# Altium PCB DRIVER POWER SUPPLY MODULE.PcbDoc
Units mm, origin at the board's own origin, x right, y up, seen from the top; angles counter-clockwise.
Board outline 240 x 215 mm, 2 copper layers (Top Layer, Bottom Layer), stack 1.371 mm thick; 120 components, 44 nets, 272 pads, 6 vias.
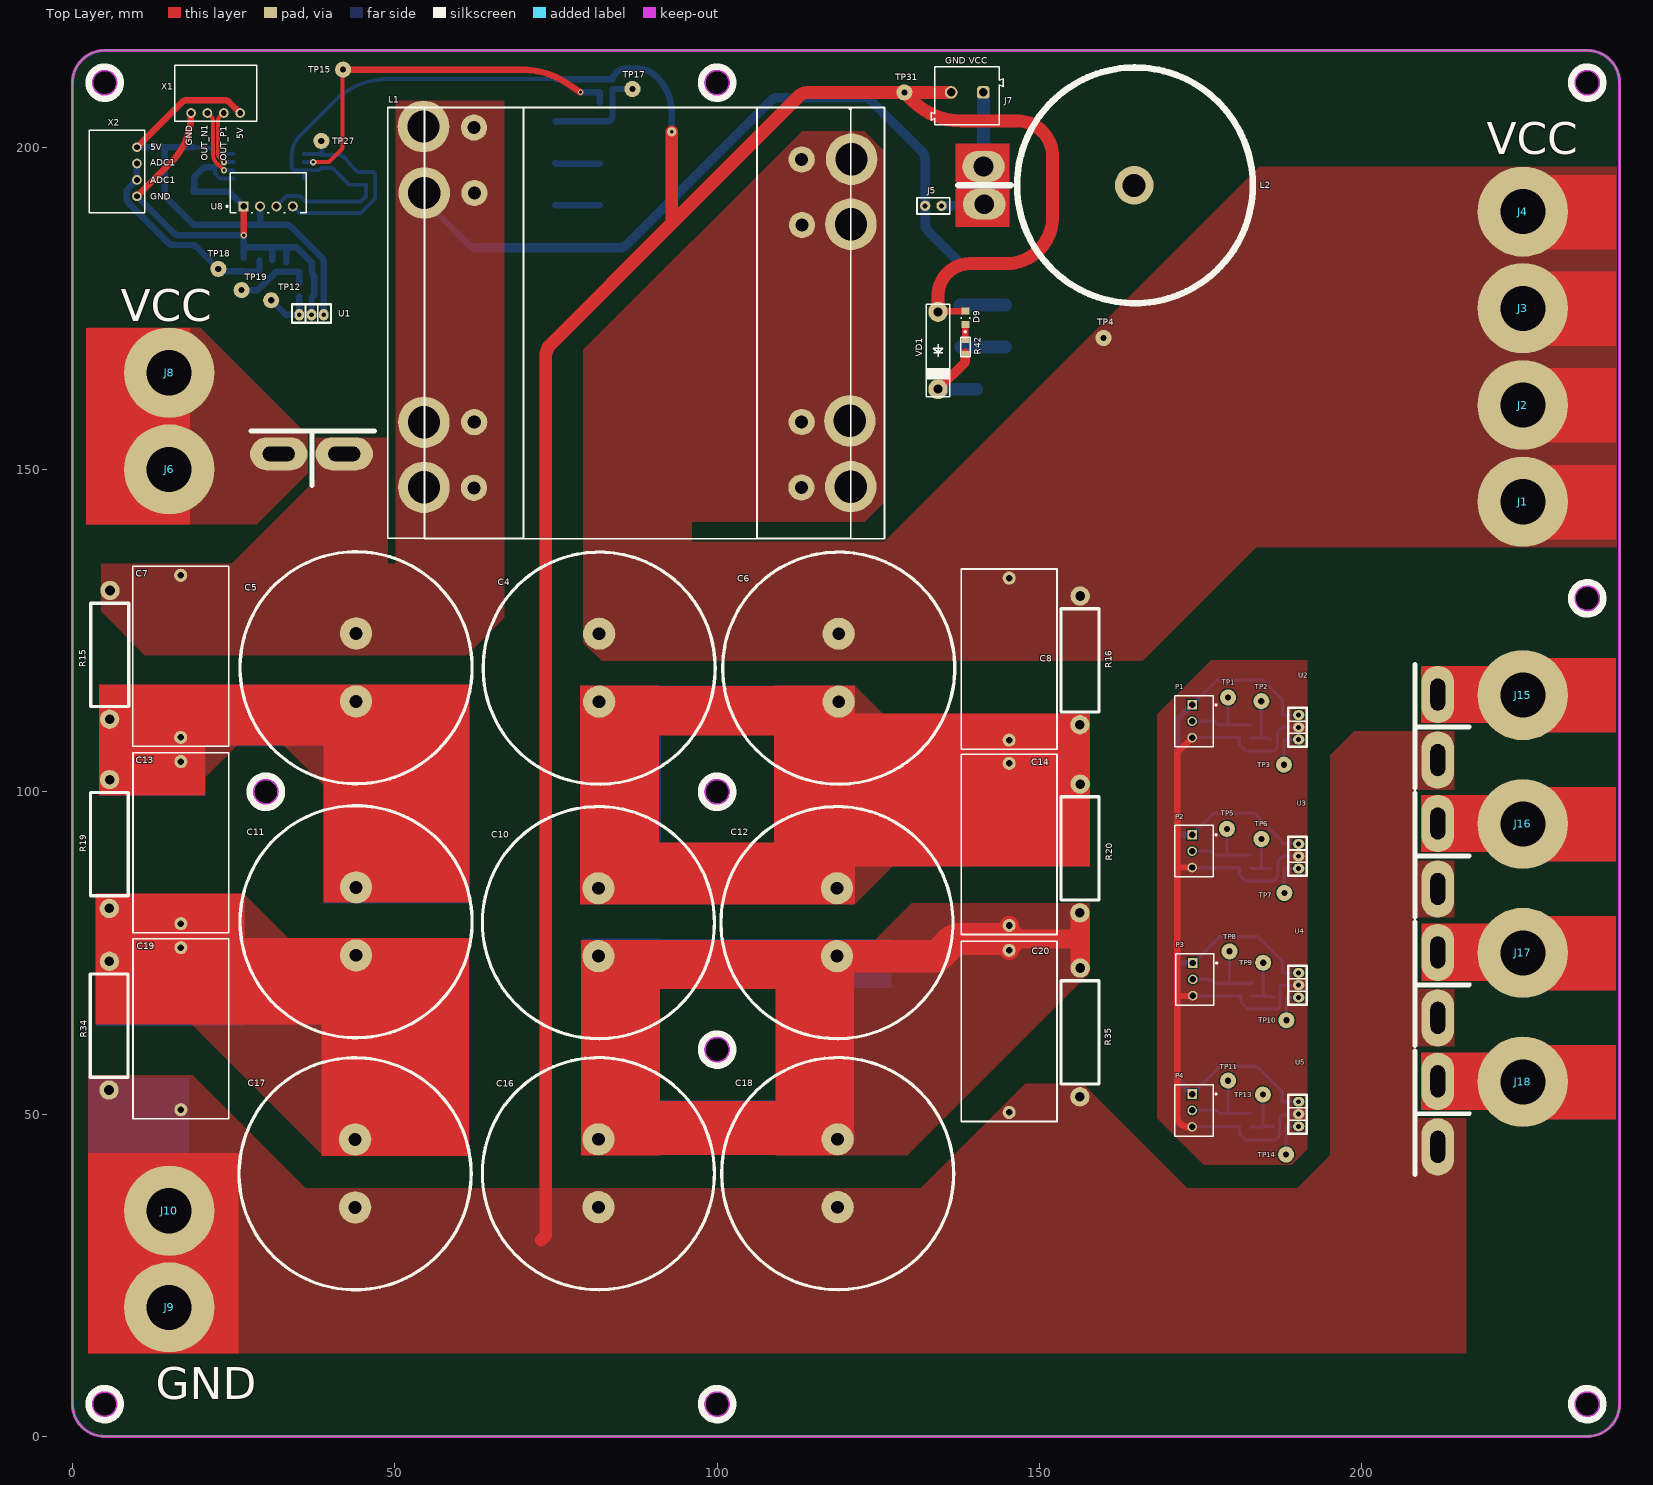
[diagram p0: Top Layer view]
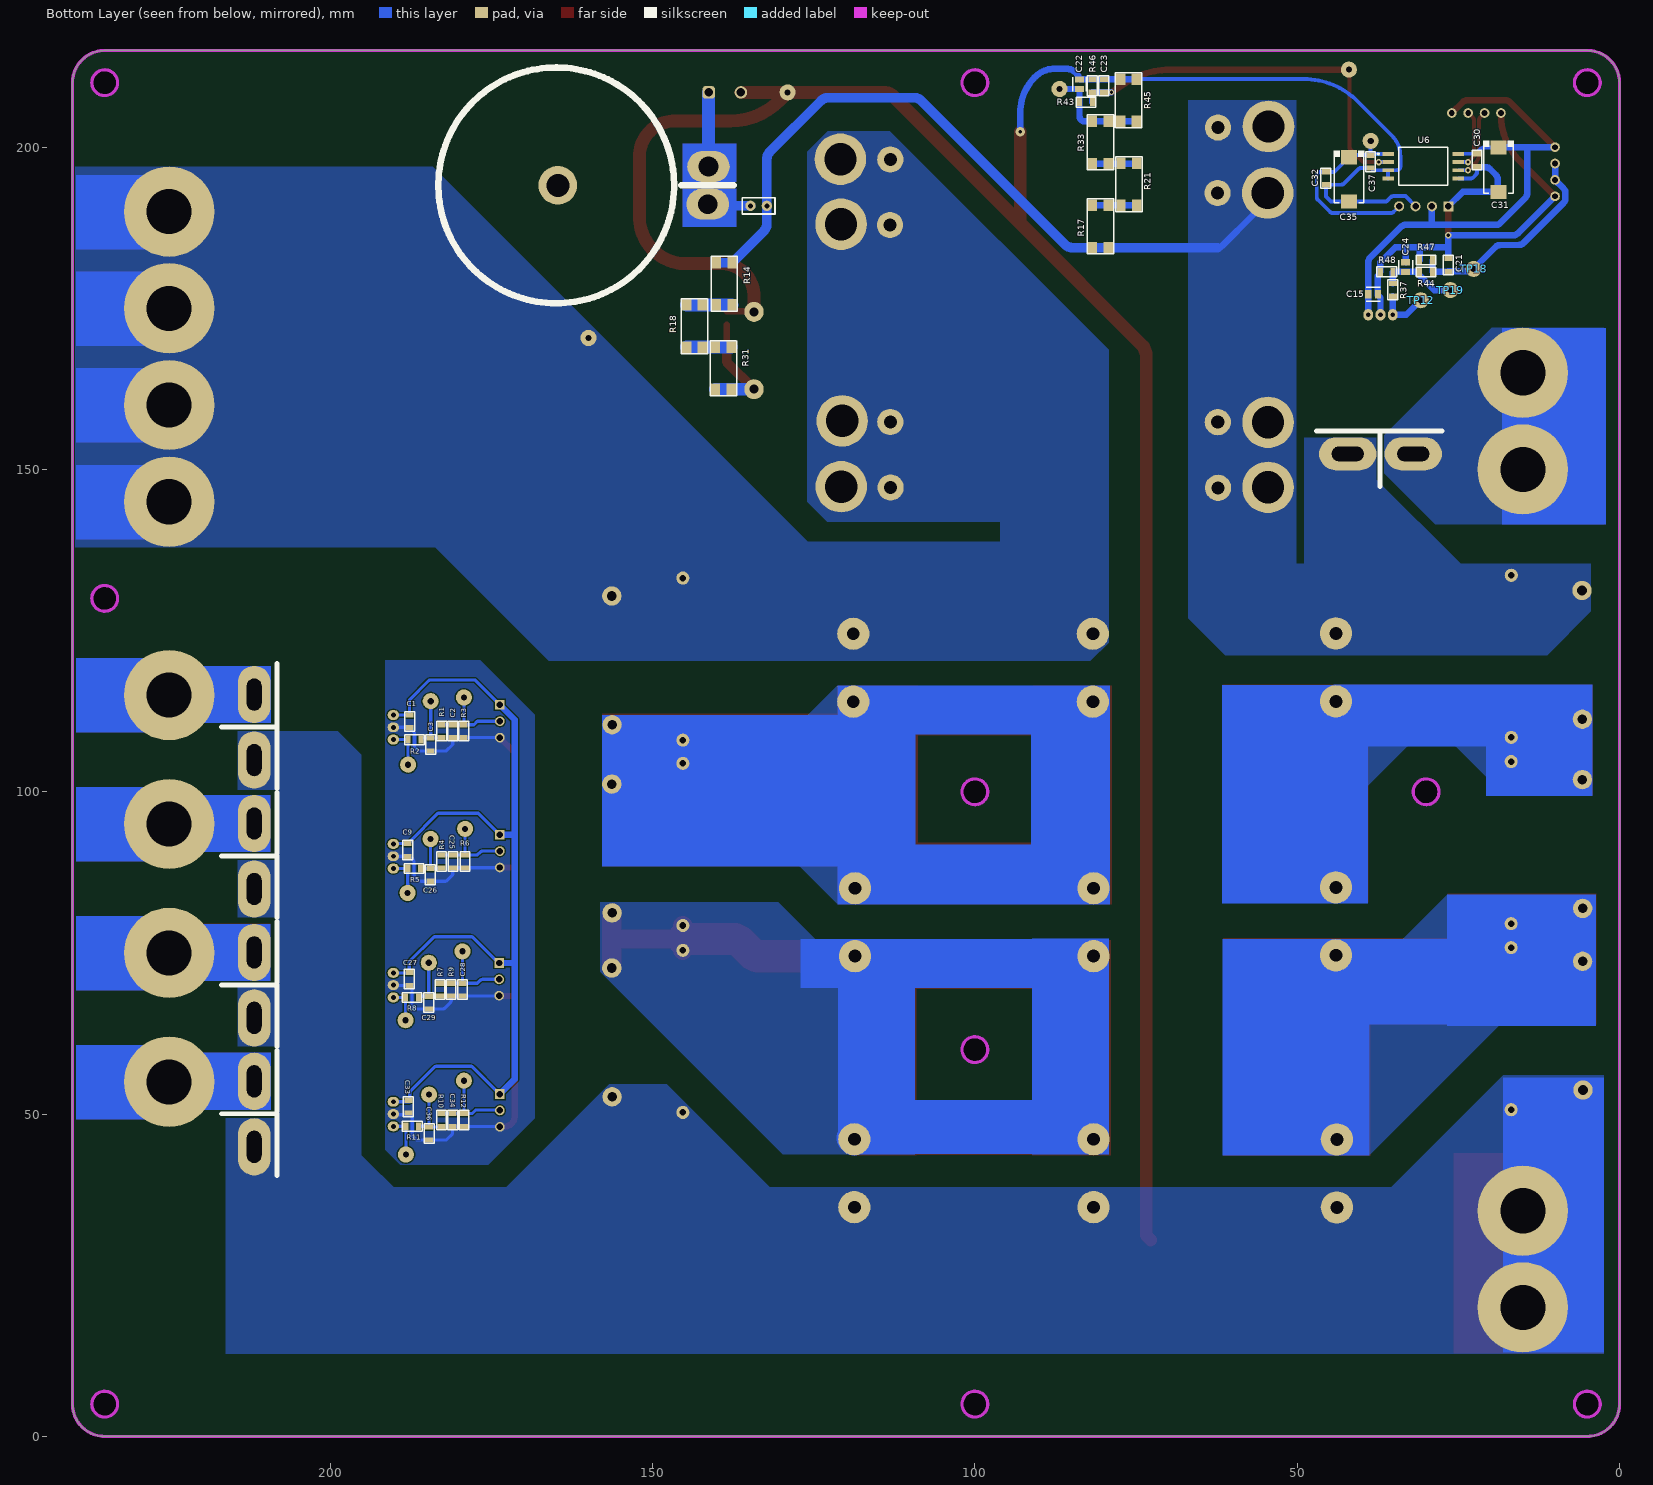
[diagram p1: Bottom Layer view, seen from below]
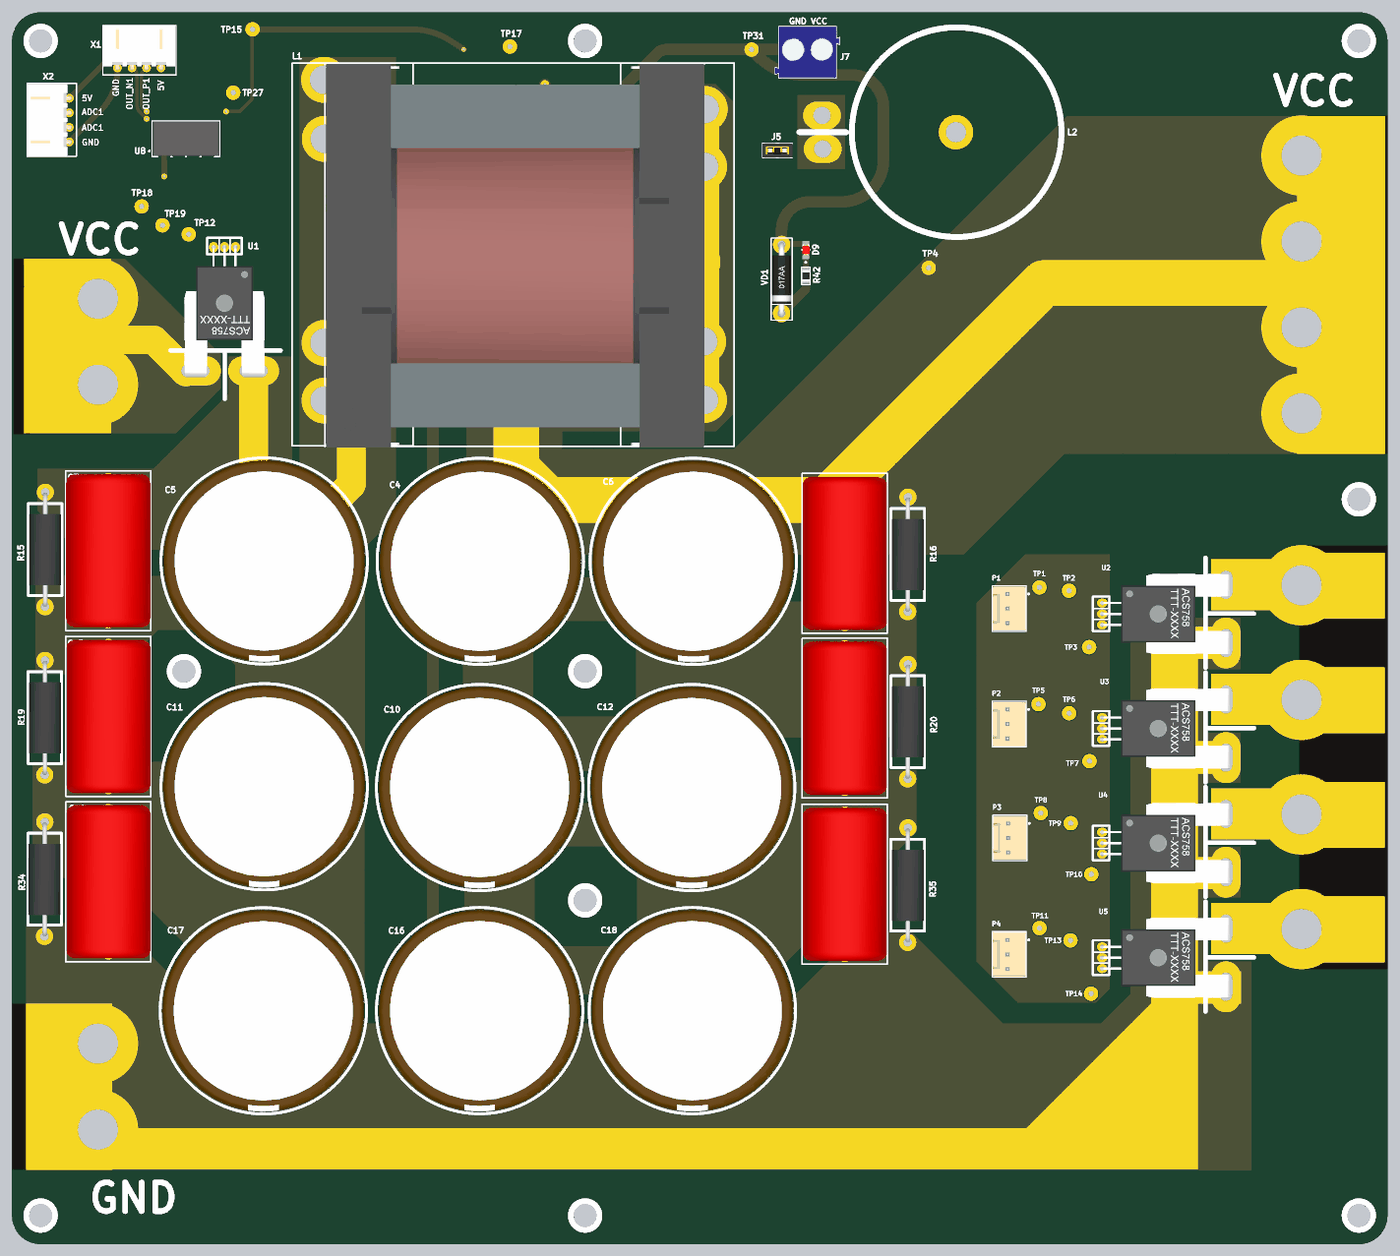
[diagram p2: 3D render of the assembled board from above, using the file's embedded part models]
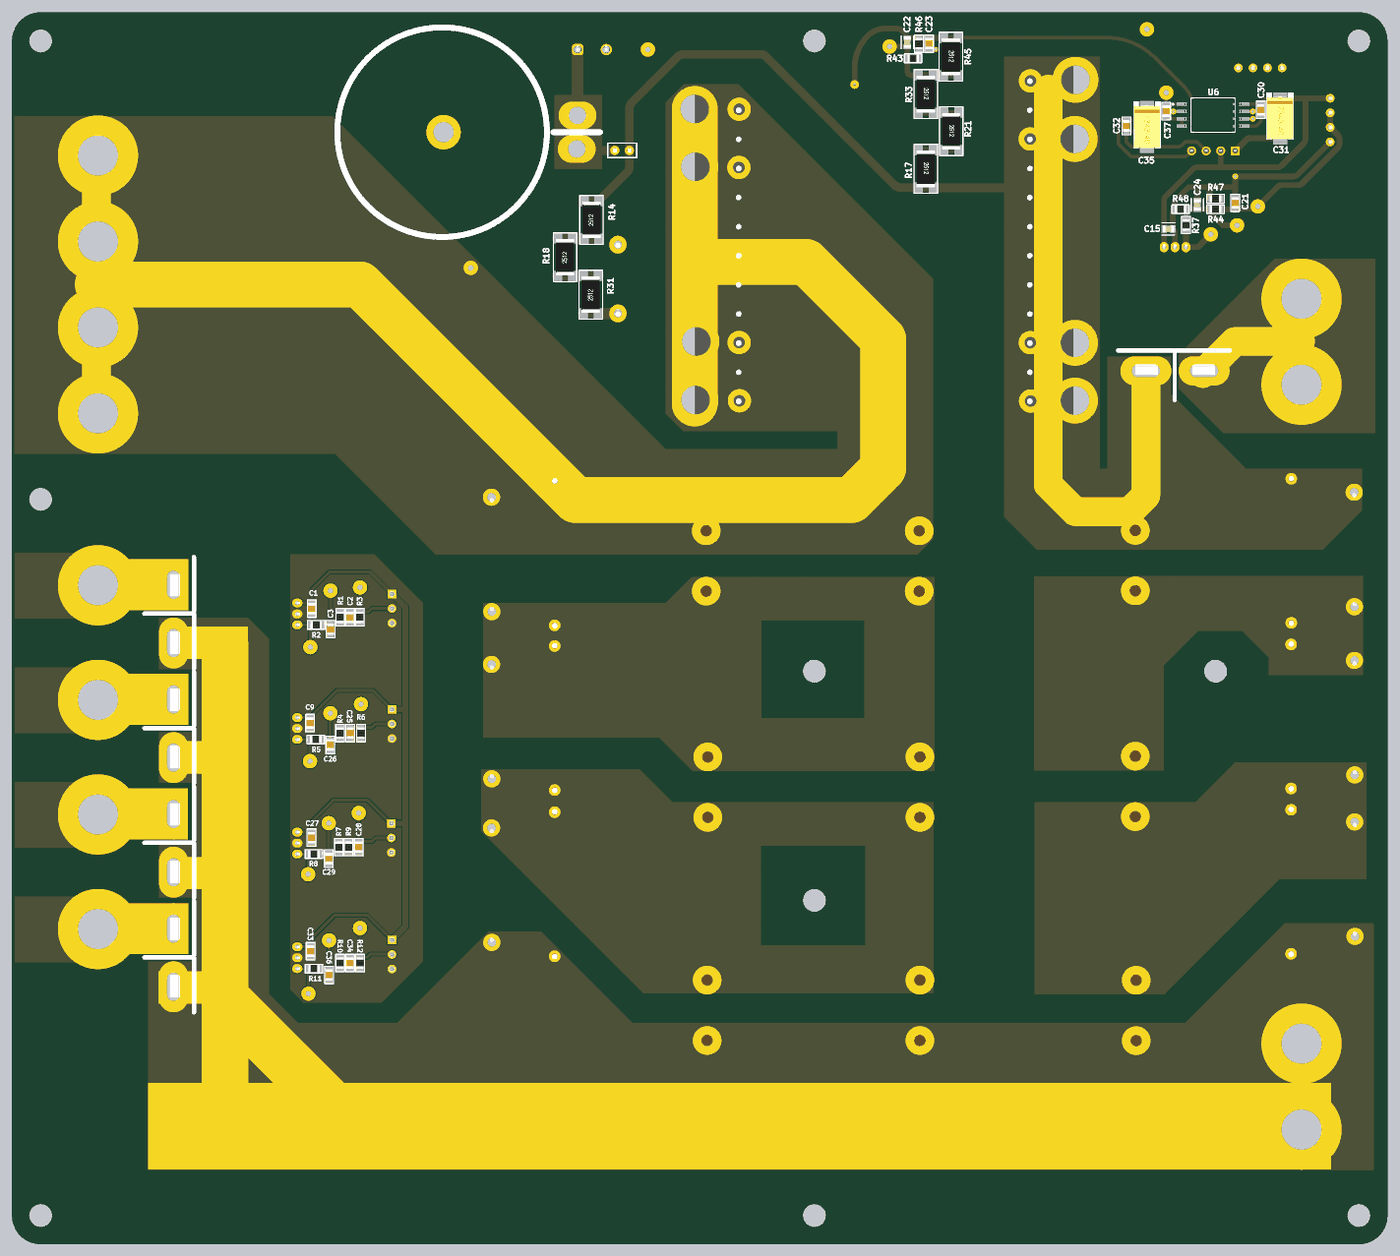
[diagram p3: 3D render of the assembled board from below, using the file's embedded part models]

## Layer stack, top to bottom
Top Solder: solder mask 0.0102, Solder Resist, Dk 3.5
Top Layer: signal copper 0.0356
Dielectric 1: dielectric 1.3, FR-4, Dk 4.8
Bottom Layer: signal copper 0.0356
Bottom Solder: solder mask 0.0102, Solder Resist, Dk 3.5

## Board outline
5,0 cw(c5,5) 0,5 0,210 cw(c5,210) 5,215 235,215 cw(c235,210) 240,210 240,5 cw(c235,5) 235,0
cut-out: 233,5 ccw(c235,5) 235,3 ccw(c235,5) 237,5 ccw(c235,5) 235,7 ccw(c235,5)
cut-out: 233,210 ccw(c235,210) 235,208 ccw(c235,210) 237,210 ccw(c235,210) 235,212 ccw(c235,210)
cut-out: 233,130 ccw(c235,130) 235,128 ccw(c235,130) 237,130 ccw(c235,130) 235,132 ccw(c235,130)
cut-out: 98,5 ccw(c100,5) 100,3 ccw(c100,5) 102,5 ccw(c100,5) 100,7 ccw(c100,5)
cut-out: 100,208 cw(c100,210) 98,210 cw(c100,210) 100,212 cw(c100,210) 102,210 cw(c100,210)
cut-out: 30,98 cw(c30,100) 28,100 cw(c30,100) 30,102 cw(c30,100) 32,100 cw(c30,100)
cut-out: 5,208 cw(c5,210) 3,210 cw(c5,210) 5,212 cw(c5,210) 7,210 cw(c5,210)
cut-out: 100,98 cw(c100,100) 98,100 cw(c100,100) 100,102 cw(c100,100) 102,100 cw(c100,100)
cut-out: 98,60 ccw(c100,60) 100,58 ccw(c100,60) 102,60 ccw(c100,60) 100,62 ccw(c100,60)
cut-out: 5,3 cw(c5,5) 3,5 cw(c5,5) 5,7 cw(c5,5) 7,5 cw(c5,5)

## Design rules (kind name [scope] priority, off if disabled: settings)
Clearance HV [InNetClass('All Nets') vs InNetClass('HV')] p1: gap=0.2 ignorepadtopadclearanceinfootprint=TRUE except(0: Text-Text Text-Hole; 0.4: THPad-THPad THPad-Via THPad-Fill THPad-Poly THPad-Region THPad-Text THPad-Hole Via-Via Via-Fill Via-Poly Via-Region Via-Text Via-Hole; 0.5: SMDPad-SMDPad SMDPad-THPad SMDPad-Via SMDPad-Fill SMDPad-Poly SMDPad-Region SMDPad-Text SMDPad-Hole Fill-Fill Fill-Poly Fill-Region Fill-Text Fill-Hole Poly-Poly Poly-Region Poly-Text Poly-Hole Region-Region Region-Text Region-Hole)
Clearance Clearance_1 [All] p2: gap=0.18 ignorepadtopadclearanceinfootprint=TRUE
Clearance GND [InNet('GND')] p3: gap=0.4 ignorepadtopadclearanceinfootprint=TRUE except(0.3: Text-Text Text-Hole)
ComponentClearance [All] p1: gap=-2.254 collisioncheckmode=3 verticalgap=0.254 showdistances=FALSE
DiffPairsRouting [All] p1: maxlimit=0.254 minlimit=0.1 mostfreqgap=0.254 toplayer_minwidth=0.3 toplayer_maxwidth=2 toplayer_prefwidth=0.3 bottomlayer_minwidth=0.3 bottomlayer_maxwidth=2 bottomlayer_prefwidth=0.3 maxuncoupledlength=12.7
Height [All] p1: minheight=0 maxheight=100 prefheight=12.7
HoleSize [All] p1: absolutevalues=TRUE maxlimit=20 minlimit=0.025 maxpercent=80.000 minpercent=20.000
HoleToHoleClearance [All] p1: gap=0 allowstackedmicrovias=TRUE
LayerPairs [All] p1 off: enforce=TRUE
MinimumSolderMaskSliver [All] p1: minsoldermaskwidth=0.01
PlaneClearance [All] p1: clearance=0.4
PlaneConnect [All] p1: planeconnectstyle=Direct reliefexpansion=0.508 reliefentries=4 reliefconductorwidth=0.254 reliefairgap=0.254
PolygonConnect [All] p1: connectstyle=Direct reliefconductorwidth=0.254 reliefentries=4 polygonreliefangle="90 Angle" airgapwidth=0.254
RoutingCorners [All] p1: cornerstyle=45-Degree minsetback=0.2 maxsetback=0.2
RoutingVias [All] p1: holewidth=0.4 width=0.8 viastyle="Through Hole" minholewidth=0.254 minwidth=0.5 maxholewidth=0.75 maxwidth=1.5
ShortCircuit [All] p1: allowed=TRUE
SilkToSilkClearance [All] p1 off: silktosilkclearance=0.01
SilkToSolderMaskClearance [All] p1: minsilkscreentomaskgap=0 clearancetoexposedcopper=FALSE
SolderMaskExpansion [All] p1: expansion=0 istentingtop=FALSE
UnRoutedNet [All] p1: checkbadconnections=TRUE
Width [All] p1: maxlimit=10 minlimit=0.254 preferedwidth=2
16 further rules are at their usual default settings.

## Classes and differential pairs
net class HV: NetC4_1 NetJ5_1 NetJ6_1 NetJ7_1 NetR31_1 V_PS

## Components (designator, comment, footprint, x,y, rotation, side; value= is the part's Value field where it differs from the comment)
C1 "CAP-NON-POLAR" CAP-0805 187.7,110.925 r90 bottom
C2 "CAP-NON-POLAR" CAP-0805 181.008,109.401 r90 bottom
C3 "CAP-NON-POLAR" CAP-0805 184.426,107.333 r90 bottom
C4 "550V_470uF" 500V_470uF 81.71,119.18 r270 top
C5 "550V_470uF" 500V_470uF 44,119.241 r270 top
C6 "550V_470uF" 500V_470uF 118.87,119.18 r270 top
C7 "4,7uF_630V" CAP_4.7uF_630V 16.79,121.013 r90 top
C8 "4,7uF_630V" CAP_4.7uF_630V 145.305,120.58 r90 top locked
C9 "CAP-NON-POLAR" CAP-0805 188,90.965 r90 bottom
C10 "550V_470uF" 500V_470uF 81.59,79.7 r270 top
C11 "550V_470uF" 500V_470uF 44,79.839 r270 top
C12 "550V_470uF" 500V_470uF 118.6,79.7 r270 top
C13 "4,7uF_630V" CAP_4.7uF_630V 16.82,92.11 r90 top
C14 "4,7uF_630V" CAP_4.7uF_630V 145.305,91.83 r90 top locked
C15 "C0805C224K5RACTU" FP-C0805C-DN-MFG 38.223,177.2 r180 bottom value="0.22 μF"
C16 "550V_470uF" 500V_470uF 81.59,40.757 r270 top
C17 "550V_470uF" 500V_470uF 43.85,40.732 r270 top
C18 "550V_470uF" 500V_470uF 118.71,40.757 r270 top
C19 "4,7uF_630V" CAP_4.7uF_630V 16.82,63.247 r90 top
C20 "4,7uF_630V" CAP_4.7uF_630V 145.305,62.827 r90 top locked
C21 "1uF" CAP-0805 26.56,181.728 r270 bottom
C22 "2.2uF" FP-C0805C-DN-MFG 83.775,209.775 r270 bottom value="0.22 μF"
C23 "1uF" CAP-0805 80,209.525 r270 bottom
C24 "2.2uF" FP-C0805C-DN-MFG 33.19,181.39 r270 bottom value="0.22 μF"
C25 "CAP-NON-POLAR" CAP-0805 180.975,89.2 r90 bottom
C26 "CAP-NON-POLAR" CAP-0805 184.475,87.125 r90 bottom
C27 "CAP-NON-POLAR" CAP-0805 187.75,70.965 r90 bottom
C28 "CAP-NON-POLAR" CAP-0805 179.5,69.3 r90 bottom
C29 "CAP-NON-POLAR" CAP-0805 184.728,67.288 r90 bottom
C30 "0.1uF" CAP-0805 22.1,197.985 r270 bottom
C31 "47uF_16V" CAP-TAN-D 18.75,196.5 r270 bottom
C32 "0.1uF" CAP-0805 45.55,195.175 r90 bottom
C33 "CAP-NON-POLAR" CAP-0805 187.9,51.143 r90 bottom
C34 "CAP-NON-POLAR" CAP-0805 181.025,49.075 r90 bottom
C35 "CAP-POLAR" CAP-TAN-D 41.975,195 r270 bottom
C36 "CAP-NON-POLAR" CAP-0805 184.677,46.977 r90 bottom
C37 "0.1uF" CAP-0805 38.625,197.746 r270 bottom
D9 "151031YS06000" LED_RED 138.525,173.517 r90 top
J1 "100A" Klema_100A#1 225,145 r180 top
J2 "100A" Klema_100A#1 225,160 r180 top
J3 "100A" Klema_100A#1 225,175 r180 top
J4 "100A" Klema_100A#1 225,190 r180 top
J5 "Jumper 1x2.54" Jumper_2.54 133.55,190.9 r180 top
J6 "100A" Klema_100A#2 17,150 r0 top
J7 "691101710002" 691101710002 138.8,208 r180 top
J8 "100A" Klema_100A#2 17,165 r0 top
J9 "100A" Klema_100A#2 17,20 r0 top
J10 "100A" Klema_100A#2 17,35 r0 top
J15 "100A" Klema_100A#1 225,115 r180 top locked
J16 "100A" Klema_100A#1 225,95 r180 top locked
J17 "100A" Klema_100A#1 225,75 r180 top locked
J18 "100A" Klema_100A#1 225,55 r180 top locked
L1 "750311457" Drossel 90.29,174.18 r270 top locked
L2 "Coil" Coil_drosel 170.161,204.235 r90 top
P1 "61900311121" 61900311121 174,110.941 r90 top locked
P2 "61900311121" 61900311121 174,90.79 r90 top locked
P3 "61900311121" 61900311121 174.1,70.9 r90 top locked
P4 "61900311121" 61900311121 174,50.565 r90 top locked
R1 "1K" RES-0805 182.725,109.401 r90 bottom
R2 "1K" RES-0805 186.938,108.095 r180 bottom
R3 "10K" RES-0805 179.325,109.401 r270 bottom
R4 "1K" RES-0805 182.752,89.2 r90 bottom
R5 "1K" RES-0805 187,88.095 r180 bottom
R6 "10K" RES-0805 179.1,89.2 r270 bottom
R7 "1K" RES-0805 182.975,69.3 r90 bottom
R8 "1K" RES-0805 187.325,68.095 r180 bottom
R9 "10K" RES-0805 181.275,69.3 r270 bottom
R10 "1K" RES-0805 182.75,49.075 r90 bottom
R11 "1K" RES-0805 187.3,48.095 r180 bottom
R12 "10K" RES-0805 179.275,49.075 r270 bottom
R14 "330K" RES-2512 138.891,178.792 r90 bottom
R15 "100K" RES-2W 5.79,121.13 r90 top
R16 "100K" RES-2W 156.305,120.27 r90 top
R17 "330K" RES-2512 80.55,187.689 r270 bottom
R18 "330K" RES-2512 143.5,172.25 r90 bottom
R19 "100K" RES-2W 5.74,91.78 r90 top
R20 "100K" RES-2W 156.305,91.09 r90 top
R21 "330K" RES-2512 76.121,194.239 r270 bottom
R31 "330K" RES-2512 139.025,165.725 r90 bottom
R33 "330K" RES-2512 80.55,200.725 r270 bottom
R34 "100K" RES-2W 5.7,63.6 r90 top
R35 "100K" RES-2W 156.305,62.55 r90 top
R37 "10K" RES-0805 35.175,177.875 r270 bottom
R42 "20K" RES-0805 138.525,169 r270 top
R43 "1K" RES-0805 82.775,206.975 r0 bottom
R44 "1K" RES-0805 30.01,180.64 r180 bottom
R45 "3K" RES-2512 76.175,207.25 r270 bottom
R46 "100K" RES-0805 81.775,209.525 r90 bottom
R47 "100K" RES-0805 30.01,182.49 r0 bottom
R48 "15K" RES-0805 36.12,180.65 r180 bottom
TP1 "Test_Point_PCB" Test_Point 179.275,114.625 r90 top
TP2 "Test_Point_PCB" Test_Point 184.425,114.05 r90 top
TP3 "Test_Point_PCB" Test_Point 187.938,104.2 r90 top
TP4 "Test_Point_PCB" Test_Point 159.95,170.4 r0 top
TP5 "Test_Point_PCB" Test_Point 179.1,94.25 r0 top
TP6 "Test_Point_PCB" Test_Point 184.45,92.675 r0 top
TP7 "Test_Point_PCB" Test_Point 188,84.3 r0 top
TP8 "Test_Point_PCB" Test_Point 179.5,75.25 r0 top
TP9 "Test_Point_PCB" Test_Point 184.729,73.475 r0 top
TP10 "Test_Point_PCB" Test_Point 188.325,64.555 r90 top
TP11 "Test_Point_PCB" Test_Point 179.275,55.175 r90 top
TP12 "Test_Point_PCB" Test_Point 30.834,176.251 r90 bottom
TP13 "Test_Point_PCB" Test_Point 184.678,53.023 r90 top
TP14 "Test_Point_PCB" Test_Point 188.275,43.725 r90 top
TP15 "" Test_Point 41.975,212.025 r90 top
TP17 "Test_Point_PCB" Test_Point 86.875,209.025 r90 top
TP18 "" Test_Point 22.622,181.128 r90 bottom
TP19 "Test_Point_PCB" Test_Point 26.25,177.825 r90 bottom
TP27 "Test_Point_PCB" Test_Point 38.6,200.975 r90 top
TP31 "Test_Point_PCB" Test_Point 129.05,208.5 r90 top
U1 "" ACS758-100 37.08,164.23 r180 top
U2 "ACS758" ACS758-100 200,110 r270 top locked
U3 "ACS758" ACS758-100 200,90 r270 top locked
U4 "ACS758" ACS758-100 200,70 r270 top locked
U5 "ACS758" ACS758-100 200,50 r270 top locked
U6 "AMC1311" FP-DWV0008A-MFG 30.45,197.05 r180 bottom
U8 "B0505S-1W" B0505S-1W 30.37,192.926 r0 top
VD1 "" DO-017AA 134.275,168.45 r90 top
X1 "CONN-4-PIN" CONN-PLS-4-2.54mm 26.015,205.3 r180 top
X2 "CONN-4-PIN" CONN-PLS-4-2.54mm 10,200 r270 top locked

## Footprints (in the part's own frame and the unit in brackets; to place one, negate y for a bottom-side part, rotate by r counter-clockwise, add the part's x,y. Pads: shape width x height; smd on the part's side, far side on the other; paste and mask are expansions set on the pad)
500V_470uF [mm]
  round 5 hole 2: 1(-5.334,0) 2(5.207,0)
  silkscreen extent -18,-18 18,18, body extent -17.6,-17.6 17.61,17.61, height 59.97
61900311121 [mm] "2.54mm Male Locking Header, 3p"
  rect 1.5x1.5 hole 1: 1(2.54,0.3)
  round 1.5 hole 1: 2(0,0.3) 3(-2.54,0.3)
  silkscreen extent -3.98,-3.52 3.98,2.98, body extent -3.81,-2.9 3.81,2.9, height 11.53
691101710002 [mm] "5,00mm - modular - blue - Horizontal entry with pressure clamp - 12,6mm height - 02p"
  rrect50% 1.95x1.95 hole 1.3: 1(-2.5,-0.5)
  round 1.95 hole 1.3: 2(2.5,-0.5)
  silkscreen extent -5.6,-4.5 5.6,4.5, body extent -5.6,-4.5 5.6,4.5, height 12.65
ACS758-100 [mil]
  oval 60x70 hole 30: 1(-75,-385) 2(0,-385) 3(75,-385)
  oval 350x200 hole 90 slot 195 at 0 deg: 4(200,465) 5(-200,465)
  silkscreen extent -385,-449 370,665, body extent -276,-404 276,492, height 280
B0505S-1W [mm]
  rect 1.55x1.55 hole 1 paste-2539.97 mask+0: 1(-3.81,-2.1)
  round 1.55 hole 1 paste-2539.97 mask+0: 2(-1.27,-2.1) 3(1.27,-2.1) 4(3.81,-2.1)
  silkscreen extent -6.52,-3.13 5.92,3.13, body extent -6.02,-3.22 6.02,3.22, height 0.25
CAP-0805 [mm]
  rect 0.8x1.25 smd mask+0.015: 1(-1,0) 2(1,0)
  silkscreen extent -1.52,-0.76 1.52,0.76, body extent -1,-0.62 1,0.63, height 0.8
CAP-TAN-D [mm]
  rect 2.2x2.5 smd: 1(-3.45,0) 2(3.45,0)
  silkscreen extent -4.5,-2.4 3.65,2.4, body extent -3.8,-2.3 3.8,2.3, height 4
CAP_4.7uF_630V [mil]
  round 80 hole 40: 1(-495,0) 2(495,0)
  silkscreen extent -550,-293 550,293, body extent -527,-289 527,289, height 1242
Coil_drosel [mil]
  oval 190x259.84 hole 120: 1(-515,1130) 2(-285,1135)
  round 236.22 hole 140: GND(-400,215)
  Top Layer region: -655,974.98 -420,974.98 -420,1304.98 -655,1304.98
  Top Layer region: -380,974.98 -145,974.98 -145,1304.98 -380,1304.98
  Bottom Layer region: -655,974.98 -420,974.98 -420,1304.98 -655,1304.98
  Bottom Layer region: -380,974.98 -145,974.98 -145,1304.98 -380,1304.98
  silkscreen extent -1120,-510 320,1290, body extent -1145,-540 351,1170, height 826
CONN-PLS-4-2.54mm [mm]
  round 1.5 hole 0.9: 1(0,0) 2(2.54,0) 3(5.08,0) 4(7.62,0)
  silkscreen extent -2.6,-7.37 10.15,1.25, body extent -2.45,-7.3 10.05,0.3, height 5.9
DO-017AA [mm]
  oval 3.1x3 hole 1.4: 1(-6,0) 2(6,0)
  silkscreen extent -7.2,-1.85 7.15,1.83, body extent -6.63,-1.7 6.37,1.7, height 3.4
Drossel [mil]
  round 314.96 hole 196.85: 1(-943,1204) 2(-546,1200) 3(655,1193) 4(1057,1199) 5(-1143,-1411) 6(-737,-1406) 7(664,-1408) 8(1061,-1408)
  round 160 hole 80: 1(-941,899) 2(-541,901) 3(662,899) 4(1062,897) 5(-1136,-1102) 6(-737,-1100) 7(663,-1101) 8(1064,-1103)
  round 0 all layers, no hole: 9(-340,-1406) 9(-339,-1104) 10(262,-1104) 10(263,-1405)
  silkscreen extent -1259,-1630 1376,1405, body extent -1251,-1399 1383,1203, height 2024
FP-C0805C-DN-MFG [mm]
  rect 0.95x1.35 smd paste+0 mask+0: 1(-0.75,0) 2(0.75,0)
  silkscreen extent -1.1,-1.07 1.1,1.07, body extent -1,-0.63 1,0.63, height 0.88
FP-DWV0008A-MFG [mm]
  rect 1.8x0.6 smd paste+0 mask+0: 1(-5.45,1.905) 2(-5.45,0.635) 3(-5.45,-0.635) 4(-5.45,-1.905) 5(5.45,-1.905) 6(5.45,-0.635) 7(5.45,0.635) 8(5.45,1.905)
  silkscreen extent -7.1,-2.98 3.8,2.98, body extent -5.75,-2.93 5.75,2.93, height 2.8
Jumper_2.54 [mm]
  round 1.6 hole 0.762: 1(-1.27,0) 2(1.27,0)
  silkscreen extent -2.54,-1.27 2.54,1.27, body extent -2.6,-1.27 2.6,1.27, height 9
Klema_100A#1 [mm]
  round 14 hole 7: 1(0,0)
  Top Layer region: -14.478,-5.715 0,-5.715 0,5.842 -14.478,5.842
  Bottom Layer region: -14.478,-5.715 0,-5.715 0,5.842 -14.478,5.842
Klema_100A#2 [mm]
  round 14 hole 7: 1(-2,0)
  Top Layer region: -14.478,-5.715 0,-5.715 0,5.842 -14.478,5.842
  Bottom Layer region: -14.478,-5.715 0,-5.715 0,5.842 -14.478,5.842
LED_RED [mm]
  rect 1.1x1.2 smd paste+0 mask+0: 1(-1.05,0) 2(1.05,0)
  silkscreen extent -2.27,-0.67 0.13,0.67, body extent -1.7,-0.77 1.7,0.77, height 0.25
RES-2W [mm]
  round 3 hole 1.5: 1(-9.875,0.025) 2(10.1,-0.025)
  silkscreen extent -7.9,-2.93 8.13,2.95, body extent -9.86,-2.79 10.01,2.79, height 5.59
RES-0805 [mm]
  rect 0.8x1.25 smd mask+0.015: 1(-1,0) 2(1,0)
  silkscreen extent -1.52,-0.76 1.52,0.76, body extent -1,-0.62 1,0.63, height 0.6
RES-2512 [mm]
  rect 1.8x1.45 smd: 1(-3.275,-1.225) 1(-3.275,1.225) 2(3.275,-1.225) 2(3.275,1.225)
  silkscreen extent -4.28,-2.05 4.25,2.05, body extent -3.2,-1.6 3.2,1.6, height 0.6
Test_Point [mm]
  round 2.5 hole 0.95: 1(0,0)

## Part data
C4 C5 C6 C10 C11 C12 C16 C17 C18: library part CAP_POL_LOW_IMP
C7 C8 C13 C14 C19 C20 C21 C23 C30 C32 C37: library part CAP-NON-POLAR
C15: library part CMP-1036-04552-2, "CAP CER 0.22UF 50V X7R 0805", Capacitance="0.22 μF", Manufacturer=KEMET, Package=C0805C-DN, Temperature="-55°C to +125°C", Temperature Characteristic=X7R, Temperature Coefficient=30ppm/°C, Temperature Range High=+125°C, Temperature Range Low=-55°C, Tolerance=0.1, Voltage Rating="50 V", Automotive=No, Category=Cap, ComponentLink2Description=Datasheet, ComponentLink2URL=https://content.kemet.com/datasheets/KEM_C1003_C0G_SMD.pdf, Device Class L1="Passive Components", Device Class L2=Capacitors, Device Class L3="Ceramic Capacitors", Digikey Description="CAP CER 0.22UF 50V X7R 0805", Height=0.88mm, Ipc Land Pattern Name=CAPC200125X78, Lead Free=Yes, Manufacturer Part Number=C0805C224K5RACTU, Material=Ceramic, Mouser Description="CAP CER 0.22UF 50V X7R 0805", Octopart=https://octopart.com/c0805c224k5ractu-kemet-144670, RoHS=TRUE
C22: library part CMP-1036-04552-2, "CAP CER  2.2UF 50V X7R 0805", Capacitance="0.22 μF", Manufacturer=KEMET, Manufacturer Part Number=C0805C224K5RACTU, Package=C0805C-DN, Temperature="-55°C to +125°C", Temperature Characteristic=X7R, Temperature Coefficient=30ppm/°C, Temperature Range High=+125°C, Temperature Range Low=-55°C, Tolerance=0.1, Voltage Rating="50 V", Automotive=No, Category=Cap, ComponentLink2Description=Datasheet, ComponentLink2URL=https://content.kemet.com/datasheets/KEM_C1003_C0G_SMD.pdf, Device Class L1="Passive Components", Device Class L2=Capacitors, Device Class L3="Ceramic Capacitors", Digikey Description="CAP CER 0.22UF 50V X7R 0805", Height=0.88mm, Ipc Land Pattern Name=CAPC200125X78, Lead Free=Yes, Material=Ceramic, Mouser Description="CAP CER 0.22UF 50V X7R 0805", Octopart=https://octopart.com/c0805c224k5ractu-kemet-144670, RoHS=TRUE
C24: library part CMP-1036-04552-2, "CAP CER 2.2UF 50V X7R 0805", Capacitance="0.22 μF", Manufacturer=KEMET, Manufacturer Part Number=C0805C224K5RACTU, Package=C0805C-DN, Temperature="-55°C to +125°C", Temperature Characteristic=X7R, Temperature Coefficient=30ppm/°C, Temperature Range High=+125°C, Temperature Range Low=-55°C, Tolerance=0.1, Voltage Rating="50 V", Automotive=No, Category=Cap, ComponentLink2Description=Datasheet, ComponentLink2URL=https://content.kemet.com/datasheets/KEM_C1003_C0G_SMD.pdf, Device Class L1="Passive Components", Device Class L2=Capacitors, Device Class L3="Ceramic Capacitors", Digikey Description="CAP CER 0.22UF 50V X7R 0805", Height=0.88mm, Ipc Land Pattern Name=CAPC200125X78, Lead Free=Yes, Material=Ceramic, Mouser Description="CAP CER 0.22UF 50V X7R 0805", Octopart=https://octopart.com/c0805c224k5ractu-kemet-144670, RoHS=TRUE
C31: library part CAP-POLAR
D9: library part LED, "WURTH ELEKTRONIK - 151031YS06000 - LED, Yellow, Through Hole, T-1 (3mm), 30 mA, 2 V, 590 nm", Manufacturer_Name="Wurth Elektronik", Mouser Part Number=710-151031YS06000, Datasheet Link=https://katalog.we-online.de/led/datasheet/151031YS06000.pdf, Geometry.Height=5.5mm, Manufacturer_Part_Number=151031YS06000, Mouser Price/Stock=https://www.mouser.co.uk/ProductDetail/Wurth-Elektronik/151031YS06000?qs=LlUlMxKIyB3xSYYW%252BcuBiQ%3D%3D
J1 J2 J3 J4 J6 J8 J9 J10 J15 J16 J17 J18: library part Klema_15_A
J7: "WR-TBL Series 101 Horizontal Entry Modular, THT, pitch 5mm, 2p", Manufacturer="Wurth Elektronik", Operating Temperature Max=105°C, Operating Temperature Min=-40°C, Rated Current=16A, Working Voltage=250V, Application="Pressure Clamp", Category="Terminal Blocks", ComponentLink1Description="Website Link", ComponentLink1URL=https://www.we-online.com/redexpert/article/691101710002?ad, ComponentLink2Description="Datasheet Link", ComponentLink2URL=https://www.we-online.com/redexpert/spec/691101710002?ad, Manufacturer Part Number=691101710002, Match Code=WR-TBL, Modularity=Yes, Mount="Through Hole", Number of Pins=2, Number of Rows=1, Orientation=Horizontal, Packaging=Box, Pitch=5mm
L1: library part DROSEL, "Drosel", Manufacturer="Wuerth Elektronik", ComponentLink1Description="Manufacturer URL", ComponentLink1URL=http://www.we-online.com, ComponentLink2Description=Datasheet, ComponentLink2URL=http://katalog.we-online.de/pbs/datasheet/750311457.pdf, PackageReference=EP13, PartNumber=750311457, Ui=36V
P1 P2 P3 P4: "WR-WTB THT Male Vertical Locking Header, pitch 2.54mm, 3p", Contact Resistance=20mOhm, Operating Temperature="-40 to +105degC", Rated Current=3A, Withstanding Voltage=1000VAC, Working Voltage=250VAC, ComponentLink1Description=Manufacturer, ComponentLink1URL=http://www.we-online.de, ComponentLink2Description=Datasheet, ComponentLink2URL=https://www.we-online.com/catalog/datasheet/61900311121.pdf, Gender=Male, Mounting Technology=THT, Packaging=Bag, Part Number=61900311121, Pin Number=3, Pitch=2.54mm, Published Date="January 2020", Publisher="Wurth Elektronik", Type=Vertical
R1 R2 R3 R4 R5 R6 R7 R8 R9 R10 R11 R12 R14 R15 R16 R17 R18 R19 R20 R21 R31 R33 R34 R35 R37 R42 R43 R44 R45 R46 R47 R48: library part RES-CONST
TP1 TP2 TP3 TP4 TP5 TP6 TP7 TP8 TP9 TP10 TP11 TP12 TP13 TP14 TP15 TP17 TP18 TP19 TP27 TP31: library part TP_PCB?, "Test_Point"
U1: library part ACS758
VD1: library part ZENER

## Via types
v1: diameter 1, hole 0.5, Top Layer to Bottom Layer, 4 vias
v2: diameter 1.5, hole 0.5, Top Layer to Bottom Layer, 1 vias
v3: diameter 0.8, hole 0.5, Top Layer to Bottom Layer, 1 vias

## Nets (pads, with @x,y where several pads share a name; then routed paths per layer and width w, separated by ;. In a path a pad name is that pad's centre, name@x,y a point inside that pad or via, vN(x,y) a via of type N, cw(c..) or ccw(c..) an arc to the next point about the centre after c; other vN are vias at no path point)
+5V: C15.1 C30.1 C31.1 U1.1 U6.8 U8.2 X1.1 X2.1 | length 82.7
  Top Layer w1: X2.1 16.983,206.983 cw(c17.689,206.275) 17.689,207.275 23.626,207.275 cw(c23.626,206.275) 24.333,206.982 X1.1 X1.1@26.024,205.3
  Bottom Layer w0.6: C31.1 20.921,199.95 cw(c20.921,198.95) 21.627,199.658 22.2,199.085 22.3,198.985 U6.8@24.97,198.985
  Bottom Layer w1: X2.1 14.196,200 ; C31.1@18.7,200 14.196,200 ; U8.2 29.1,187.95 ; C15.1 38.973,182.163 ccw(c37.973,182.163) 38.68,182.87 33.893,187.657 ccw(c33.186,186.95) 33.186,187.95 29.1,187.95 ; U1.1 C15.1@38.985,177.2 ; 14.196,200 14.325,199.871 14.325,192.826 ccw(c15.325,192.826) 14.617,192.12 18.494,188.243 ccw(c19.201,188.95) 19.201,187.95 29.1,187.95
+5V_1: C1.2 C9.2 C27.2 C33.2 P1.1 P2.1 P3.1 P4.1 U2.1 U3.1 U4.1 U5.1 | length 151.7
  Bottom Layer w0.5: 171.375,73.23 171.585,73.44 ; P4.1 177.874,57.279 cw(c178.227,56.925) 178.227,57.425 183.518,57.425 cw(c183.518,56.925) 183.871,57.279 187.529,53.621 cw(c187.175,53.268) 187.675,53.268 187.675,51.905 U5.1 ; P2.1 177.031,96.661 183.304,96.661 187.625,92.34 187.625,92.115 187.775,91.965 C9.2 190.161,91.965 U3.1 ; P1.1 177.569,117.35 184.418,117.35 cw(c184.418,116.85) 184.771,117.204 187.7,114.275 C1.2 187.72,111.905 U2.1 ; P3.1@173.855,73.385 177.849,77.379 cw(c178.202,77.025) 178.202,77.525 183.693,77.525 cw(c183.693,77.025) 184.046,77.379 187.605,73.82 cw(c187.25,73.468) 187.75,73.468 C27.2 187.81,71.905 U4.1
  Bottom Layer w1: 171.585,73.44 P3.1 ; P4.1 171.375,55.43 171.375,73.23 171.375,93.33 ; P2.1 171.375,93.33 ; P1.1 171.375,111.156 171.375,93.33
GND: C15.2 C21.1 C24.1 C30.2 C31.2 R47.2 R48.1 U1.2 U6.5 U8.1 X1.4 X2.4 | length 86.1
  Top Layer w1: X2.4 15.382,197.762 ccw(c8.112,205.034) 18.395,205.034 X1.4 ; v1(26.56,186.35) 26.54,190.486 cw(c27.54,190.49) 26.54,190.49 26.54,190.551 U8.1
  Bottom Layer w0.6: C30.2 22.099,196.885 22.099,196.165 ccw(c22.699,196.166) 22.274,195.743 22.698,195.319 ccw(c23.121,195.745) 23.118,195.145 U6.5
  Bottom Layer w1: X2.4 15.737,186.643 ccw(c16.444,187.35) 16.444,186.35 23.725,186.35 24.058,186.35 v1(26.56,186.35) 26.56,184.475 ; C31.2 18.9,193.65 18.9,195.011 cw(c19.9,195.011) 19.192,195.717 20.068,196.593 cw(c20.774,195.885) 20.774,196.885 C30.2@22.099,196.885 ; C31.2@18.9,193.05 24.336,193.05 U8.1 ; C21.1@26.611,182.828 26.611,182.853 26.56,182.905 26.56,184.475 ; R47.2 31.01,184.475 ; C24.1 33.19,184.475 ; U1.2 37.08,176.657 37.473,177.05 C15.2 37.473,180.072 37.412,180.133 cw(c38.12,180.839) 37.12,180.839 37.12,182.116 34.761,184.475 33.19,184.475 ; 26.56,184.475 31.01,184.475 ; 31.01,184.475 33.19,184.475
GND_1: C1.1 C2.1 C3.1 C9.1 C25.1 C26.1 C27.1 C28.1 C29.1 C33.1 C34.1 C36.1 P1.3 P2.3 P3.3 P4.3 R3.2 R6.2 R9.2 R12.2 U2.2 U3.2 U4.2 U5.2 | length 152.1
  Top Layer w1: P4.3 173.075,48.025 cw(c173.075,49.725) 171.375,49.725 171.375,68.316 ; P2.3 171.375,88.25 ; P1.3 171.521,106.222 ccw(c171.875,105.869) 171.375,105.869 171.375,88.25 ; P3.3 cw(c173.596,68.816) 173.598,68.316 171.375,68.316 ; 171.375,68.316 171.375,88.25
  Bottom Layer w0.5: P4.3 173.75,48.075 R12.2 C34.1 ; P3.3@173.7,68.325 181.25,68.325 R9.2 181.25,68.15 181.25,67.645 ccw(c181.75,67.645) 181.395,67.292 182.254,66.434 ccw(c182.607,66.788) 182.607,66.288 C29.1 186.786,66.288 ccw(c186.786,66.788) 187.138,66.433 187.18,66.475 ccw(c186.825,66.827) 187.325,66.827 187.325,69.54 187.375,69.59 187.375,69.815 187.525,69.965 C27.1 U4.2@190.186,69.965 ; P2.3 173.75,88.2 R6.2 C25.1 180.992,88.05 180.992,87.34 ccw(c181.492,87.34) 181.138,86.987 181.855,86.271 ccw(c182.207,86.625) 182.207,86.125 C26.1 185.9,86.125 ccw(c185.9,87.225) 187,87.225 187,88.638 187,88.989 cw(c187.818,88.988) 187.238,89.565 187.325,89.652 cw(c187.678,89.298) 187.492,89.762 187.625,89.815 C9.1 188.035,90 U3.2 ; P1.3 R3.2 C2.1 ; C2.1 181.008,107.333 182.008,106.333 C3.1 186.338,106.333 186.938,106.933 186.938,109.163 187.325,109.55 187.325,109.775 187.475,109.925 C1.1 187.775,110 U2.2 ; C34.1 181.025,46.977 182.025,45.977 C36.1 186.625,45.977 187.129,46.481 ccw(c186.775,46.835) 187.275,46.835 187.275,49.298 cw(c187.775,49.298) 187.421,49.651 187.675,49.905 190.126,49.905 U5.2
  Bottom Layer w1: U4.2@190.186,69.965 U4.2
GND_HV: C16.2 C17.2 C18.2 C19.1 C20.1 C22.1 C23.1 C32.1 C35.2 C37.2 D9.2 J7.2 J9.1 J10.1 R34.1 R35.1 R45.1 R46.2 TP31.1 U2.4 U3.4 U4.4 U5.4 U6.3 U6.4 U8.3 VD1.2 | length 404.8
  Top Layer w1: VD1.2@134.392,174.567 D9.2
  Top Layer w2: 72.725,30.45 73.425,31.15 73.425,168.022 73.785,168.893 ; 73.868,169.093 93.213,188.438 112.689,207.914 cw(c114.103,206.5) 114.103,208.5 TP31.1 ; v2(92.975,202.4) 92.975,188.675 93.071,188.579 ; VD1.2 134.275,174.5 134.275,176.952 cw(c139.252,176.948) 139.252,181.925 139.257,181.925 144.8,181.925 ccw(c144.8,189.175) 152.05,189.171 152.05,198.545 ccw(c146.523,198.548) 146.529,204.075 ccw(c146.523,198.548) 146.525,204.075 137.899,204.075 137.896,204.075 cw(c137.92,214.806) 130.35,207.2 TP31.1 ; J7.2 TP31.1
  Bottom Layer w0.6: U8.3 33.214,192.4 35.088,192.4 cw(c35.088,191.8) 35.512,192.225 36.011,191.726 ccw(c36.435,192.15) 36.435,191.55 44.75,191.55 45.55,192.35 C32.1 43.168,194.175 cw(c43.168,194.775) 42.744,194.351 40.496,196.599 ccw(c40.071,196.175) 40.071,196.775 38.625,196.775 38.44,196.59 cw(c38.016,197.015) 38.016,196.415 U6.3 ; U6.4 U6.3 ; R45.1@74.95,210.575 48.977,210.575 48.975,210.575 ccw(c48.975,198.806) 40.652,207.127 35.292,201.767 ccw(c38.435,198.638) 34,198.638 34,198.636 34,197.015 ccw(c34.6,197.015) 34.6,196.415 U6.3
  Bottom Layer w1: R45.1@74.95,210.525 75.47,210.525 77.4,210.525 C23.1 R46.2 C22.1 cw(c85.849,210.046) 85.849,212.175 87.591,212.175 cw(c87.596,207.829) 90.674,210.897 cw(c85.114,205.341) 92.975,205.341 v2(92.975,202.4)
NetC2_2: C2.2 P1.2 R1.2 R3.1 TP1.1 | length 13.5
  Bottom Layer w0.5: P1.2 177.175,110.941 177.715,110.401 R3.1 ; TP1.1 179.275,110.451 R3.1 ; R1.2 C2.2 R3.1
NetC3_2: C3.2 R1.1 R2.2 TP2.1 | length 9
  Bottom Layer w0.5: R1.1 183.1,108.333 C3.2 ; TP2.1 TP2.1 C3.2 ; R2.2 185.788,108.245 185.714,108.282 ccw(c185.493,107.833) 185.493,108.333 C3.2
NetC4_1: C4.1 C6.1 C8.2 J1.1 J2.1 J3.1 J4.1 L1.1 L1.2 L1.3 L1.4 R16.2 TP4.1
NetC4_2: C4.2 C6.2 C8.1 C10.1 C12.1 C14.2 R16.1 R20.2 | length 173.4
  Top Layer w3: C4.2@81.59,113.853 C4.2 ; C12.1 C12.1@118.87,85.304 ; C14.2 145.305,106.163 ; C8.1 145.305,106.163 ; R16.1 156.33,110.345 156.33,106.163 ; R20.2 156.33,106.163 ; 145.305,106.163 156.33,106.163
  Top Layer w5: C10.1@81.24,85.284 113.762,85.284 ; C10.1 C4.2@81.59,113.853 ; C12.1@118.87,85.304 118.87,106.163 ; C6.2 118.87,106.163 ; 145.305,106.163 118.87,106.163
  Bottom Layer w5: C10.1 114.112,85.034
NetC5_2: C5.2 C7.1 C11.1 C13.2 R15.1 R19.2
NetC10_2: C10.2 C12.2 C14.1 C16.1 C18.1 C20.2 R20.1 R35.2 | length 210.5
  Top Layer w3: C12.2 C12.2@118.71,74.383 ; 133.754,74.493 ccw(c133.754,75.493) 134.46,74.785 ; 136.533,76.858 cw(c137.239,76.15) 137.239,77.15 ; C20.2 145.305,77.15 ; C14.1 145.305,77.15 ; R20.1 156.33,81.165 156.33,77.15 ; R35.2 156.33,77.15 ; 145.305,77.15 156.33,77.15
  Top Layer w5: C16.1 C10.2 ; C16.1@81.639,46.14 C18.1@118.661,46.14 ; C12.2 133.754,74.493 ; C18.1 C12.2@118.71,74.383 ; 134.46,74.785 136.533,76.858 ; 137.239,77.15 145.305,77.15
  Bottom Layer w5: C16.1@81.939,46.29 C18.1@118.961,46.29 ; C12.2 118.71,74.383 C18.1
NetC11_2: C11.2 C13.1 C17.1 C19.2 R19.1 R34.2 | length 79.3
  Top Layer w3: R19.1 5.715,77.775 ; R34.2 5.715,73.71 5.715,77.775 ; C19.2 16.82,77.679 ; C13.1 16.82,77.679 ; C17.1 C17.1@43.95,46.166 ; 5.715,77.775 5.811,77.679 16.82,77.679
  Top Layer w5: 16.966,77.825 18.102,77.677 cw(c17.454,72.719) 20.019,77.011 22.944,75.263 ccw(c25.504,79.557) 25.496,74.557 25.502,74.557 C11.2@43.925,74.557 ; C17.1@44,46.216 C11.2
NetC21_2: C21.2 R44.2 R47.1 TP18.1 X2.2 X2.3 | length 33.1
  Bottom Layer w1: X2.2 X2.3 8.692,193.612 ccw(c9.4,192.906) 8.4,192.906 8.4,192.037 ccw(c9.4,192.039) 8.691,191.334 14.907,185.118 ccw(c15.614,185.825) 15.614,184.825 18.511,184.825 cw(c18.511,183.825) 19.218,184.532 TP18.1@23,180.75 ; TP18.1@23.022,180.728 C21.2 ; C21.2@26.736,180.64 27.3,180.64 R44.2 R47.1
NetC22_2: C22.2 R33.1 R43.2 R45.2 TP17.1 | length 16.4
  Bottom Layer w1: R45.2@74.95,203.975 74.975,204 79.325,204 82.975,204 ccw(c82.975,204.8) 83.775,204.8 R43.2 C22.2@83.775,208.775 ; C22.2 TP17.1
NetC23_2: C23.2 R43.1 R46.1 TP15.1 U6.2 | length 60.6
  Top Layer w0.6: v1(37.35,197.685) 39.523,197.685 ccw(c39.523,198.285) 39.946,197.86 41.725,199.639 ccw(c41.3,200.062) 41.9,200.062 41.9,210.776 cw(c42.5,210.776) 42.075,211.2 TP15.1@42.2,211.325
  Top Layer w1: TP15.1 69.79,212.025 69.795,212.025 cw(c69.794,199.664) 76.567,210.004 v3(78.825,208.525)
  Bottom Layer w0.6: U6.2 v1(37.35,197.685)
  Bottom Layer w1: v3(78.825,208.525) C23.2 R46.1 R43.1
NetC24_2: C24.2 R37.1 R44.1 R48.2 TP19.1 | length 11.8
  Bottom Layer w1: TP19.1 28.709,177.825 31.534,180.65 R48.2 35.175,180.595 R37.1
NetC25_2: C25.2 P2.2 R4.2 R6.1 TP5.1 | length 13.3
  Bottom Layer w0.5: P2.2 176.403,90.79 cw(c176.403,90.29) 176.756,90.644 177.2,90.2 R6.1 ; TP5.1 R6.1 ; R4.2 C25.2 R6.1
NetC26_2: C26.2 R4.1 R5.2 TP6.1 | length 7.9
  Bottom Layer w0.5: R4.1 182.857,88.095 184.475,88.095 R5.2 ; TP6.1@184.425,92.7 184.475,92.65 C26.2
NetC28_2: C28.2 P3.2 R7.2 R9.1 TP8.1 | length 14.4
  Bottom Layer w0.5: P3.2 176.368,70.9 cw(c176.368,70.4) 176.721,70.754 177.175,70.3 C28.2 ; TP8.1 C28.2 ; R7.2 R9.1 C28.2
NetC29_2: C29.2 R7.1 R8.2 TP9.1 | length 8.6
  Bottom Layer w0.5: R7.1 184.717,68.3 C29.2 ; TP9.1 C29.2 ; R8.2 ccw(c185.735,67.288) 185.737,68.288 C29.2
NetC32_2: C32.2 C35.1 C37.1 TP27.1 U6.1 U8.4 | length 32.4
  Bottom Layer w0.6: U8.4 35.03,189.976 ccw(c35.454,190.401) 35.454,189.801 44.514,189.801 ccw(c44.514,190.401) 44.939,189.976 46.8,191.838 ccw(c46.375,192.262) 46.975,192.262 46.975,195.575 ccw(c46.375,195.575) 46.375,196.175 C32.2 44.25,196.175 42.925,197.5 42.925,197.65 42.125,198.45 C35.1 41.65,198.775 38.625,198.775 C37.1@38.612,198.787 ; U6.1 38.196,198.955 cw(c38.196,198.355) 38.397,198.92 38.525,198.875 C37.1@38.612,198.787 ; TP27.1 38.612,200.963 38.612,198.92 C37.1@38.612,198.787
NetC34_2: C34.2 P4.2 R10.2 R12.1 TP11.1 | length 14.4
  Bottom Layer w0.5: P4.2 173.76,50.625 177.475,50.625 178.025,50.075 R12.1 ; TP11.1 R12.1 ; R10.2 C34.2 R12.1
NetC36_2: C36.2 R10.1 R11.2 TP13.1 | length 8.7
  Bottom Layer w0.5: R10.1 182.848,47.977 C36.2 ; TP13.1 C36.2 ; R11.2 184.795,48.095 C36.2
NetD9_1: D9.1 R42.1 | length 2.2
  Top Layer w1: R42.1@138.525,170.235 D9.1
NetJ5_1: J5.1 L2.1 | length 6.7
  Bottom Layer w1.5: J5.1 141.172,190.9 ccw(c141.169,192.05) L2.1@141.205,190.901 ; L2.1@141.205,190.9 L2.1
NetJ6_1: J6.1 J8.1 U1.4
NetJ7_1: J7.1 L2.2 | length 11.5
  Bottom Layer w2: J7.1 141.332,208.468 L2.2
NetJ15_1: J15.1 U2.5 | length 0.1
  Top Layer w2: J15.1@224.92,115.08 J15.1
NetJ16_1: J16.1 U3.5 | length 0.1
  Top Layer w2: U3.5 U3.5@211.891,95
NetJ17_1: J17.1 U4.5 | length 0.1
  Top Layer w2: U4.5 U4.5@211.891,75
NetJ18_1: J18.1 U5.5 | length 0.1
  Top Layer w2: J18.1@224.92,55.08 J18.1
NetR2_1: R2.1 TP3.1 U2.3 | length 6.2
  Bottom Layer w0.5: TP3.1 R2.1 U2.3
NetR5_1: R5.1 TP7.1 U3.3 | length 6
  Bottom Layer w0.5: TP7.1 R5.1 U3.3
NetR8_1: R8.1 TP10.1 U4.3 | length 5.4
  Bottom Layer w0.5: TP10.1 R8.1 U4.3
NetR11_1: R11.1 TP14.1 U5.3 | length 6.3
  Bottom Layer w0.5: TP14.1 188.275,48.07 R11.1 U5.3
NetR14_1: R14.1 R18.2 | length 7.1
  Bottom Layer w2: R14.1@137.666,175.517 137.674,175.525 142.275,175.525 R18.2@144.725,175.525
NetR17_1: R17.1 R21.2 | length 6.9
  Bottom Layer w1: R21.2@74.896,190.964 77.346,190.964 79.325,190.964 R17.1@81.775,190.964
NetR18_1: R18.1 R31.2 | length 6.9
  Bottom Layer w2: R31.2@137.8,169 137.825,168.975 142.275,168.975 R18.1@144.725,168.975
NetR21_1: R21.1 R33.2 | length 6.9
  Bottom Layer w1: R21.1@74.896,197.514 74.961,197.45 79.325,197.45 R33.2@81.775,197.45
NetR31_1: R31.1 R42.2 VD1.1 | length 13.3
  Top Layer w1.5: VD1.1 138.525,166.7 R42.2
  Bottom Layer w2: VD1.1 137.8,162.45 R31.1@140.25,162.45
NetR37_2: R37.2 TP12.1 U1.3 | length 8.5
  Bottom Layer w1: TP12.1@30.61,176.475 33.076,174.009 U1.3 R37.2@35.175,176.875
NetU6_6: U6.6 X1.3 | length 11.3
  Top Layer w0.6: X1.3 21.617,204.618 cw(c21.193,204.194) 21.793,204.197 21.82,198.755 ccw(c23.418,198.761) 22.286,197.633 22.287,197.632 v1(23.504,196.415)
  Bottom Layer w0.6: v1(23.504,196.415) U6.6
NetU6_7: U6.7 X1.2 | length 9.8
  Top Layer w0.6: X1.2@23.474,205.299 ccw(c23.899,204.875) 23.473,205.298 22.749,204.574 ccw(c23.173,204.15) 22.573,204.148 22.599,198.835 ccw(c23.199,198.838) 22.774,198.415 v1(23.504,197.685)
  Bottom Layer w0.6: v1(23.504,197.685) U6.7
V_PS: C5.1 C7.2 J5.2 L1.5 L1.6 L1.7 L1.8 R14.2 R15.2 R17.2 U1.5 | length 116.7
  Bottom Layer w1: L1.6@54.578,192.9 54.578,192.162 56.735,190.004 56.735,189.59 61.657,184.668 ccw(c62.364,185.375) 62.364,184.375
  Bottom Layer w1.5: 62.364,184.375 R17.2@79.777,184.375 ; R17.2@79.325,184.414 81.775,184.414 84.918,184.414 ccw(c84.918,185.914) 85.977,184.852 108.361,207.236 cw(c109.421,206.175) 109.421,207.675 122.779,207.675 cw(c122.779,206.175) 123.838,207.237 123.839,207.236 131.842,199.233 cw(c130.78,198.174) 132.28,198.174 132.28,188.075 ccw(c133.78,188.075) 132.719,187.015 137.666,182.067 R14.2@140.116,182.067
pads on no net: L1.9 L1.10 L2.GND

## Polygon pours and split planes (outlines as drawn)
NetC4_2 on Top Layer "NONET_L-01_P-001" (solid, pour order 23): 129.495,108.344 121.339,116.501 121.339,102.221
GND_1 on Top Layer "NONET_L-01_P-001" (solid, pour order 34): 176.7,120.4 168.3,112 168.3,49.375 175.525,42.15 189.125,42.15 191.525,44.55 191.525,120.4
GND_HV on Top Layer "NONET_L-01_P-001" (solid, pour order 32): 156.707,54.718 175.325,36.1 129.225,36.1 147.843,54.718
NetC4_1 on Top Layer "NONET_L-01_P-001" (solid, pour order 6): 122.796,202.45 125.977,199.269 125.977,144.977 122.875,141.875 96.05,141.875 96.05,138.775 125.95,138.775 184.1,196.925 240,196.925 240,137.95 183.65,137.95 166.025,120.325 82.075,120.325 79.275,123.125 79.275,168.55 113.175,202.45
GND_HV on Top Layer "NONET_L-01_P-001" (solid, pour order 30): 214.351,109.365 212.837,109.365 198.815,109.365 195.125,105.675 195.125,43.625 189.587,38.087 216.25,38.087 216.25,49.365 208.2,49.365 208.2,60.491 214.351,60.491 214.351,69.328 208.2,69.328 208.2,80.517 214.351,80.517 214.351,89.276 208.2,89.276 208.2,100.325 214.351,100.325
GND_HV on Top Layer "NONET_L-01_P-001" (solid, pour order 5): 18.675,56.025 2.45,56.025 2.45,12.875 216.25,12.875 216.25,38.5 36.2,38.5
NetC11_2 on Top Layer "NONET_L-01_P-001" (solid, pour order 28): 35.644,75.081 25.91,68.186 25.91,74.036 25.91,76.136 25.91,79.236 26.625,84.1
NetC5_2 on Top Layer "NONET_L-01_P-001" (solid, pour order 26): 31.635,108.355 41.369,115.249 41.369,109.399 41.369,107.299 41.369,104.199 40.654,99.335
NetC4_2 on Top Layer "NONET_L-01_P-001" (solid, pour order 24): 121.391,82.676 129.341,90.626 123.491,90.626 121.391,90.626 118.291,90.626 115.422,90.626
NetC5_2 on Top Layer "NONET_L-01_P-001" (solid, pour order 21): 27.06,108.71 17.325,115.605 17.325,109.755 17.325,107.655 17.325,104.555 18.04,99.69
NetC11_2 on Top Layer "NONET_L-01_P-001" (solid, pour order 20): 17.632,64.818 38.706,43.744 38.706,73.837
NetC4_2 on Top Layer "NONET_L-01_P-001" (solid, pour order 16): 121.35,82.55 129.3,90.5 123.45,90.5 121.35,90.5 118.25,90.5 115.382,90.5
NetC10_2 on Top Layer "NONET_L-01_P-001" (solid, pour order 12): 130.225,82.725 118.4,70.9 118.4,43.6 129.5,43.6 157.85,71.95 157.85,82.725
V_PS on Top Layer "NONET_L-01_P-001" (solid, pour order 3): 50.15,143.075 67,143.075 67,207.212 50.15,207.212
V_PS on Top Layer "NONET_L-01_P-001" (solid, pour order 11): 37.725,154.959 37.725,152.409 37.725,148.4 24.725,135.4 24.725,131.575 48.888,131.575 48.888,154.959
V_PS on Top Layer "NONET_L-01_P-001" (solid, pour order 10): 4.427,128 11.227,121.2 61.2,121.2 67,127 67,147.775 62.55,147.775 50.15,147.775 50.15,135.387 46.605,135.387 28.025,135.387 4.427,135.387
NetJ6_1 on Top Layer "NONET_L-01_P-001" (solid, pour order 1): 2.45,171.977 2.45,141.5 28.55,141.5 36.475,149.425 36.475,155.312 19.81,171.977
GND_1 on Bottom Layer "NONET_L-01_P-001" (solid, pour order 35): 176.75,120.4 168.3,111.95 168.3,49.375 175.525,42.15 189.125,42.15 191.466,44.491 191.466,120.4
GND_HV on Bottom Layer "NONET_L-01_P-001" (solid, pour order 29): 214.351,109.365 212.837,109.365 198.815,109.365 195.175,105.725 195.175,43.647 188.878,37.35 216.25,37.35 216.25,49.365 208.2,49.365 208.2,60.491 214.351,60.491 214.351,69.65 208.2,69.65 208.2,80.517 214.351,80.517 214.351,89.365 207.925,89.365 207.925,100.325 214.351,100.325
GND_HV on Bottom Layer "NONET_L-01_P-001" (solid, pour order 33): 156.75,54.625 178.505,32.87 130.575,32.87 130.575,37.425 147.775,54.625
NetC4_1 on Bottom Layer "NONET_L-01_P-001" (solid, pour order 31): 122.796,202.45 125.977,199.269 125.977,144.977 122.875,141.875 96.05,141.875 96.05,138.775 125.95,138.775 184.1,196.925 240,196.925 240,137.95 183.75,137.95 166.125,120.325 82.075,120.325 79.275,123.125 79.275,168.55 113.175,202.45
GND_HV on Bottom Layer "NONET_L-01_P-001" (solid, pour order 4): 18.003,56.025 2.45,56.025 2.45,12.85 216.25,12.85 216.25,38.625 35.403,38.625
NetC11_2 on Bottom Layer "NONET_L-01_P-001" (solid, pour order 27): 35.644,75.081 25.91,68.186 25.91,74.036 25.91,76.136 25.91,79.236 26.625,84.1
NetC5_2 on Bottom Layer "NONET_L-01_P-001" (solid, pour order 25): 31.635,108.355 41.369,115.249 41.369,109.399 41.369,107.299 41.369,104.199 40.654,99.335
NetC4_2 on Bottom Layer "NONET_L-01_P-001" (solid, pour order 22): 121.35,82.636 129.3,90.586 123.45,90.586 121.35,90.586 118.25,90.586 115.382,90.586
NetC4_2 on Bottom Layer "NONET_L-01_P-001" (solid, pour order 17): 129.506,108.312 121.35,116.468 121.35,102.189
NetC5_2 on Bottom Layer "NONET_L-01_P-001" (solid, pour order 18): 27.06,108.71 17.325,115.605 17.325,109.755 17.325,107.655 17.325,104.555 18.04,99.69
NetC11_2 on Bottom Layer "NONET_L-01_P-001" (solid, pour order 19): 17.664,64.786 38.786,43.664 38.786,73.825
NetC10_2 on Bottom Layer "NONET_L-01_P-001" (solid, pour order 15): 130.525,82.875 118.7,71.05 118.7,43.75 129.8,43.75 158.15,72.1 158.15,82.875
V_PS on Bottom Layer "NONET_L-01_P-001" (solid, pour order 2): 50.15,143.075 66.925,143.075 66.925,207.275 50.15,207.275
V_PS on Bottom Layer "NONET_L-01_P-001" (solid, pour order 9): 37.725,154.959 37.725,152.409 37.725,148.425 24.725,135.425 24.725,131.575 48.888,131.575 48.888,154.959
V_PS on Bottom Layer "NONET_L-01_P-001" (solid, pour order 8): 4.427,128 11.227,121.2 61.2,121.2 66.925,126.925 66.925,147.775 62.55,147.775 50.15,147.775 50.15,135.387 46.605,135.387 28.025,135.387 4.427,135.387
NetJ6_1 on Bottom Layer "NONET_L-01_P-001" (solid, pour order 0): 2.45,171.977 2.45,141.5 28.55,141.5 36.475,149.425 36.475,155.312 19.81,171.977

## Keep-outs
Keep-Out Layer:
  circle w0.5: c100,5 r2
  circle w0.5: c100,210 r2
  circle w0.5: c30,100 r2
  circle w0.5: c100,60 r2
  circle w0.5: c100,100 r2
  circle w0.5: c235,130 r2
  circle w0.5: c5,210 r2
  circle w0.5: c5,5 r2
  circle w0.5: c235,5 r2
  circle w0.5: c235,210 r2
  lines w0.5: 0,5 ccw(c5,5) 5,0 235,0 ccw(c235,5) 240,5 240,210 ccw(c235,210) 235,215 5,215 ccw(c5,210) 0,210 0,5

## Other copper
Top Layer:
  rectangle net NetJ17_1: 209.262,70.662 227.716,79.537
  rectangle net NetJ18_1: 209.212,50.65 227.666,59.525
  rectangle net NetJ16_1: 209.241,90.662 227.695,99.537
  rectangle net NetJ15_1: 209.216,110.662 227.67,119.537
  rectangle net NetC4_2: 81.002,108.753 118.677,116.371
  region net NetC4_2: 90.975,82.55 90.975,116.473 78.7,116.473 78.7,82.55
  region net NetC4_2: 121.35,92.103 79.711,92.103 79.711,82.55 121.35,82.55
  region net NetC4_2: 108.85,116.468 108.85,82.784 121.375,82.784 121.375,116.468
  rectangle net NetC4_2: 116.846,88.4 157.83,112.145
  region net NetC10_2: 91.175,43.575 91.175,77.015 78.925,77.015 78.925,43.575
  region net NetC5_2: 38.925,116.659 38.925,82.815 61.575,82.815 61.575,116.659
  region net NetC11_2: 38.625,77.293 38.625,43.5 61.484,43.5 61.484,77.293
  rectangle net NetC5_2: 4.1,107.175 44.245,116.675
  rectangle net NetC5_2: 4.1,99.442 20.575,110.267
  region net NetC11_2: 26.65,63.9 26.65,84.2 3.55,84.2 3.55,63.9
  rectangle net NetC11_2: 6.575,63.9 46.72,77.293
  rectangle net NetC10_2: 81.165,69.397 118.839,77.015
  region net NetC10_2: 119.61,52.028 81.936,52.028 81.936,44.41 119.61,44.41
  region net NetC10_2: 118.813,43.607 118.813,76.625 109.025,76.625 109.025,43.607
  rectangle net GND_HV: 2.425,12.875 25.775,43.975
  rectangle net NetJ6_1: 2.1,141.5 18.25,171.977
Bottom Layer:
  rectangle net NetJ15_1: 209.225,110.65 227.679,119.525
  rectangle net NetJ16_1: 209.25,90.65 227.704,99.525
  rectangle net NetJ18_1: 209.221,50.638 227.675,59.513
  rectangle net NetJ17_1: 209.271,70.65 227.725,79.525
  rectangle net NetC4_2: 117.196,88.4 157.83,111.895
  region net NetC4_2: 109.2,116.468 109.2,82.534 121.35,82.534 121.35,116.468
  region net NetC4_2: 117.735,91.853 80.061,91.853 80.061,84.235 117.735,84.235
  region net NetC4_2: 91.325,82.534 91.325,116.5 79.05,116.5 79.05,82.534
  rectangle net NetC4_2: 81.35,108.85 119.024,116.468
  region net NetC10_2: 119.91,52.178 82.236,52.178 82.236,44.56 119.91,44.56
  region net NetC10_2: 119.113,43.757 119.113,76.775 109.325,76.775 109.325,43.757
  rectangle net NetC10_2: 81.465,69.547 127.025,77.165
  region net NetC10_2: 91.125,43.741 91.125,77.2 79.225,77.2 79.225,43.741
  region net NetC11_2: 38.75,77.132 38.75,43.567 61.609,43.567 61.609,77.132
  region net NetC5_2: 39.05,116.534 39.05,82.69 61.7,82.69 61.7,116.534
  rectangle net NetC5_2: 4.225,107.05 44.37,116.643
  rectangle net NetC5_2: 4.225,99.317 20.7,110.142
  region net NetC11_2: 26.775,63.7 26.775,84.075 3.675,84.075 3.675,63.7
  rectangle net NetC11_2: 6.7,63.9 46.845,77.168
  rectangle net GND_HV: 2.4,12.975 18.075,55.7
  rectangle net NetJ6_1: 2.1,141.5 18.25,171.977

## Silkscreen, mask and mechanical layers (free items; w line width, h text height)
Top Overlay:
  circle w1: c100,5 r2.5
  circle w1: c100,210 r2.5
  circle w1: c30,100 r2.5
  circle w1: c100,60 r2.5
  circle w1: c100,100 r2.5
  circle w1: c235,130 r2.5
  circle w1: c235,5 r2.5
  circle w1: c5,5 r2.5
  circle w1: c235,210 r2.5
  circle w1: c5,210 r2.5
  text "GND VCC" at 135.429,212.979 h1
  text "5V" at 26.458,201.2 h1 r90
  text "GND" at 18.618,200.2 h1 r90
  text "5V" at 12.05,199.519 h1
  text "VCC" at 219.425,198.9 h5
  text "OUT_N1" at 21.001,197.886 h1 r90
  text "OUT_P1" at 23.894,197.886 h1 r90
  text "ADC1" at 12.05,197.14 h1
  text "ADC1" at 12.05,194.394 h1
  text "GND" at 12.05,191.84 h1
  text "VCC" at 7.525,173 h5
  text "GND" at 12.9,5.725 h5
Top Solder:
  rectangle: 198.775,19.95 206.925,105.1
  region: 193.982,13.443 206.682,26.143 199.625,33.2 186.925,20.5
  region: 181.813,13.137 206.763,38.087 200.788,44.063 175.837,19.113
  rectangle: 198.8,102.15 213.325,107.8
  rectangle: 199.113,82.129 213.638,87.779
  rectangle: 199.4,61.925 213.925,67.575
  rectangle: 199.888,41.979 214.413,47.629
  rectangle: 209.212,50.65 227.666,59.525
  rectangle: 209.262,70.662 227.716,79.537
  rectangle: 209.241,90.662 227.695,99.537
  rectangle: 209.216,110.662 227.67,119.537
  rectangle: 224.558,47.975 241.804,122
  rectangle: 224.229,137.95 241.475,196.975
  region: 206.925,13.05 206.925,20.225 9.8,20.225 9.8,13.05
  rectangle: -0.246,13 17.5,42
  rectangle: 0.229,141.35 17.297,171.977
  lines w0.5: 15,157.375 15.175,157.55 ; 32.225,151.95 33,151.95
  lines w5: 13.304,157.818 24.754,157.818 30.354,152.218 ; 42.16,152.419 42.16,130.665 44.975,127.85 54.5,127.85 59.2,132.55 59.2,201.575 ; 120.872,146.728 120.872,198.132
  lines w8: 119.6,171.425 101.45,171.425 88,157.975 88,135.425 93.55,129.875 142.175,129.875 180.025,167.725 228.7,167.725 229.375,168.4
Bottom Solder:
  rectangle: 198.775,19.95 206.925,105.1
  rectangle: 198.8,102.15 213.325,107.8
  rectangle: 199.113,82.129 213.638,87.779
  rectangle: 199.4,61.925 213.925,67.575
  rectangle: 199.888,41.979 214.413,47.629
  region: 187.783,21.517 205.558,39.292 199.375,45.475 181.6,27.7
  rectangle: 209.212,50.65 227.666,59.525
  rectangle: 209.262,70.662 227.716,79.537
  rectangle: 209.241,90.662 227.695,99.537
  rectangle: 209.216,110.662 227.67,119.537
  region: 216.25,13.05 216.25,28.175 9.8,28.175 9.8,13.05
  lines w5: 15.175,157.55 26.625,157.55 32.225,151.95 ; 42.16,152.419 42.16,130.665 44.975,127.85 54.5,127.85 59.2,132.55 59.2,201.575 ; 225.275,144.85 225.275,189.95
  lines w8: 119.6,171.425 101.45,171.425 88,157.975 88,135.425 93.55,129.875 141.675,129.875 179.3,167.5 225.025,167.5 ; 120.872,146.728 120.872,198.132
  text "A" at 1326.95,844.829 h2.5
  text "A" at 1319.372,843.683 h2.5
  text "B" at 1327.111,644.729 h2.5
  text "B" at 1319.533,643.583 h2.5
  text "G" at 1184.36,519.385 h2.5
  text "N" at 1185.971,519.385 h2.5
  text "D" at 1187.582,519.385 h2.5
  text "G" at 1176.781,518.239 h2.5
  text "N" at 1178.392,518.239 h2.5
  text "D" at 1180.003,518.239 h2.5
  text "C" at 1327.111,444.468 h2.5
  text "C" at 1319.533,443.322 h2.5
  text "D" at 1327.111,244.207 h2.5
  text "D" at 1319.533,243.061 h2.5
  text "6" at 1225.077,146.574 h2.5
  text "6" at 1217.498,145.428 h2.5